# Allegro board SD3589CV100DMEB_PCB_VA.brd
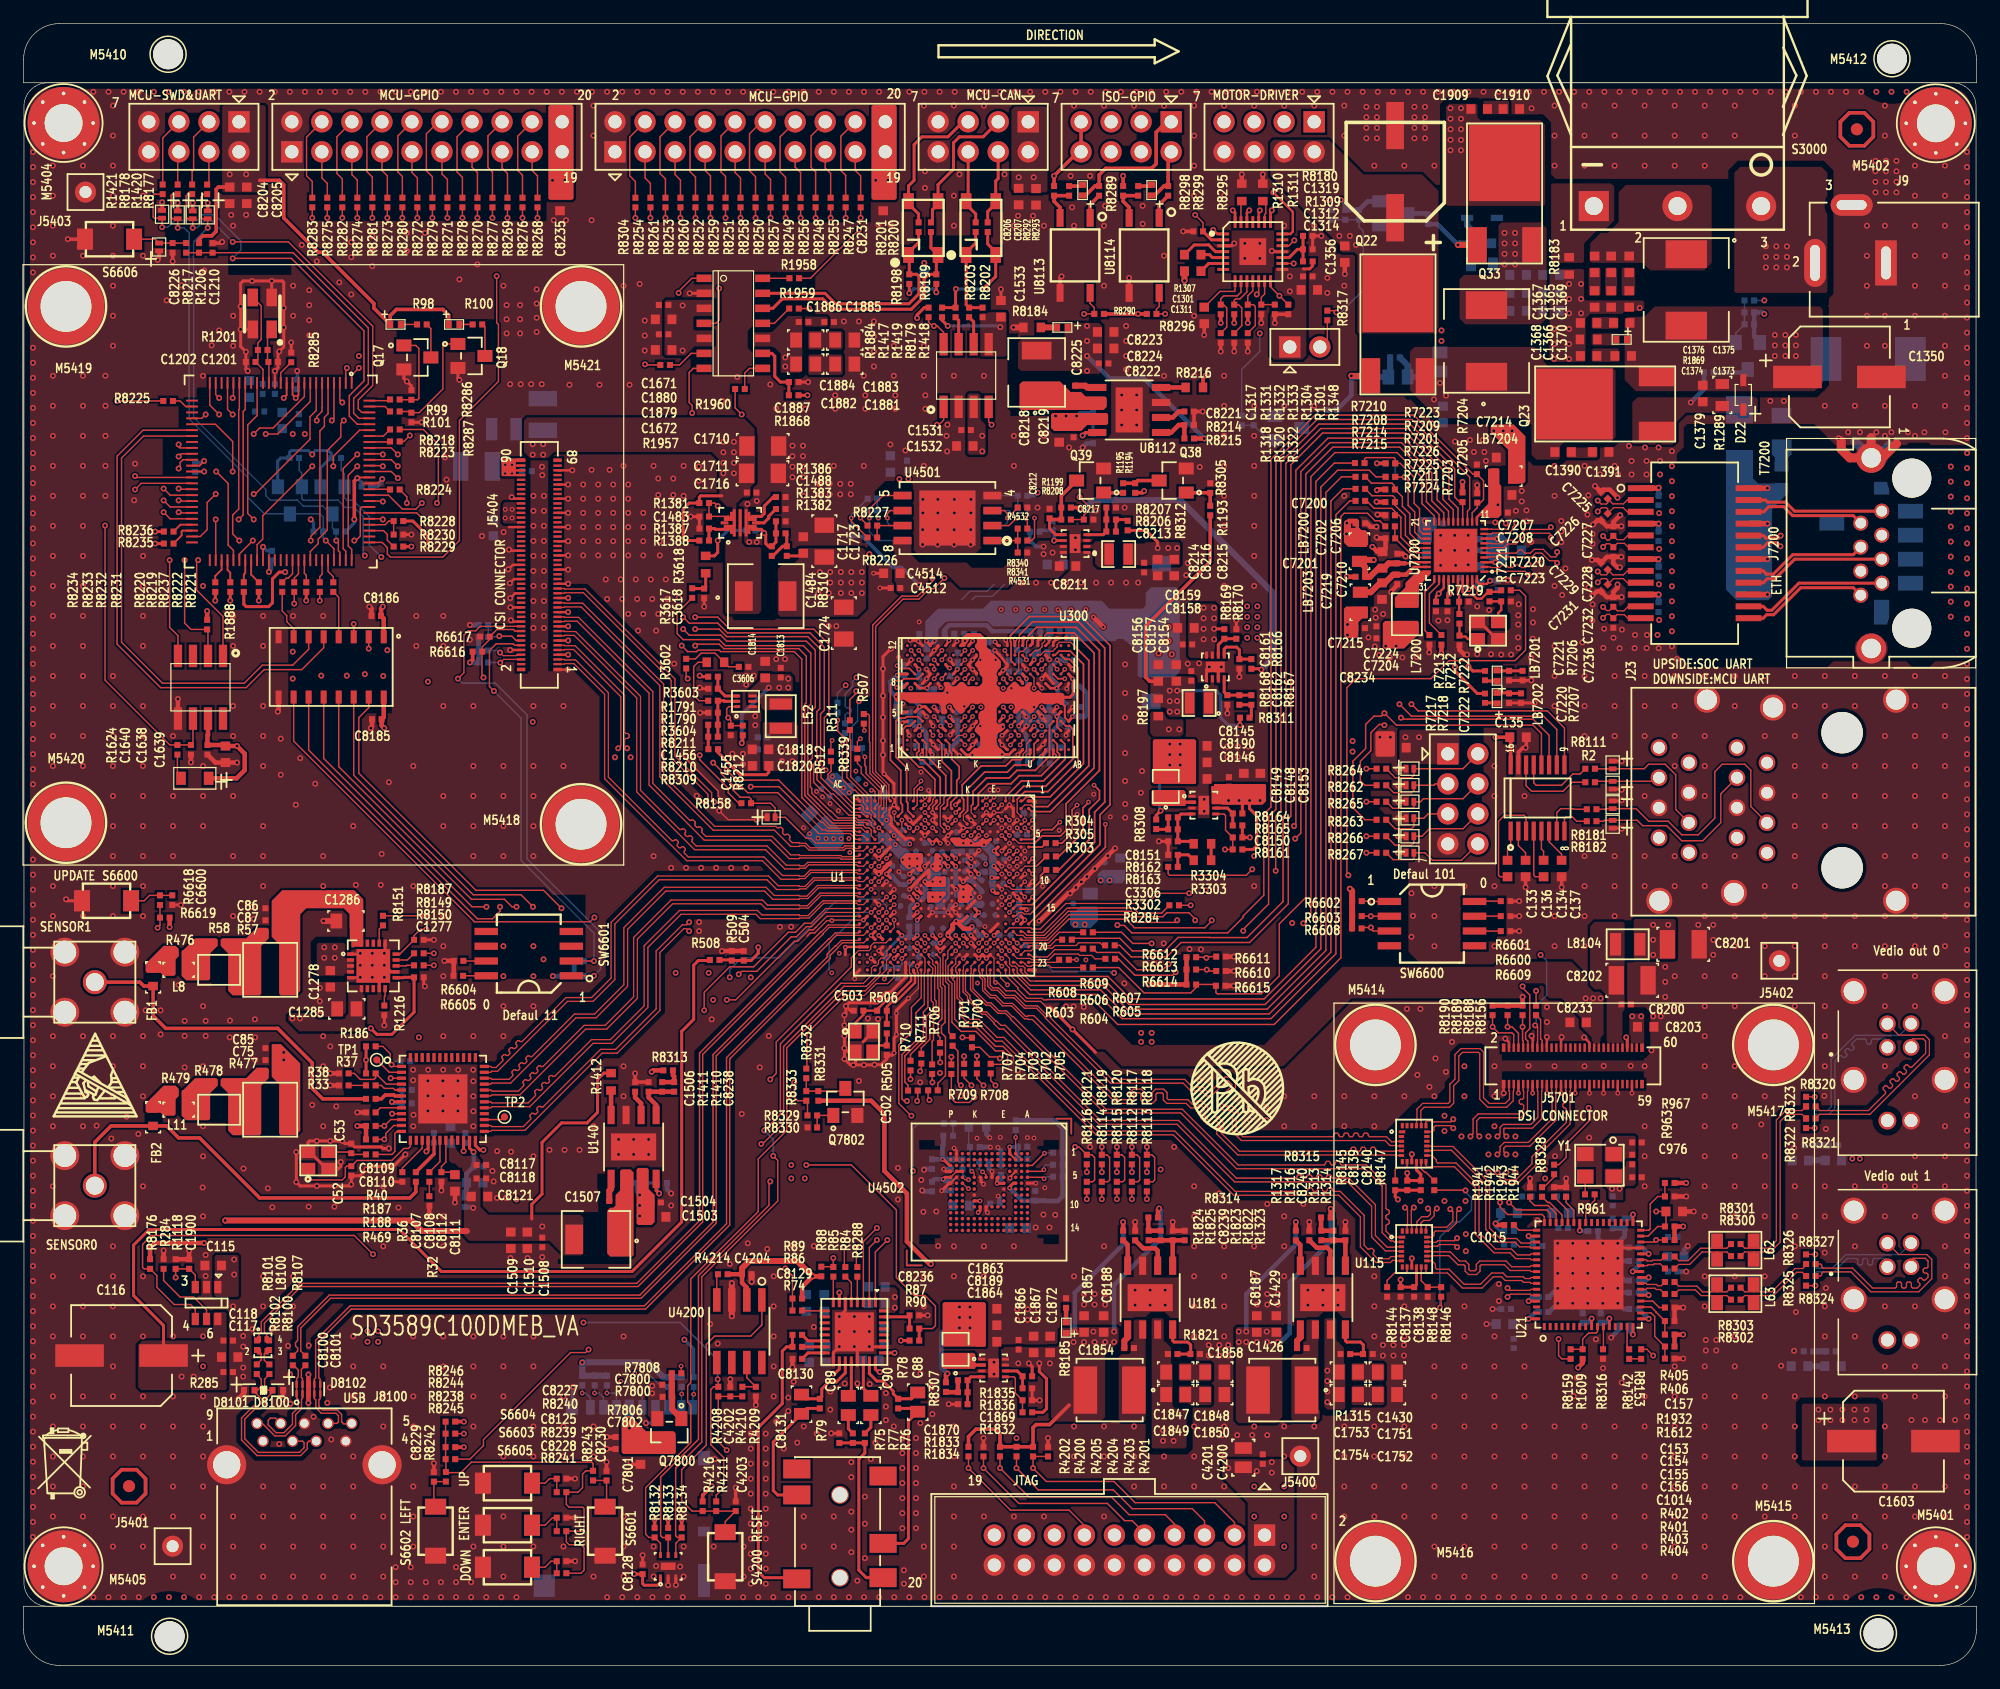
[diagram p0: board, top side]
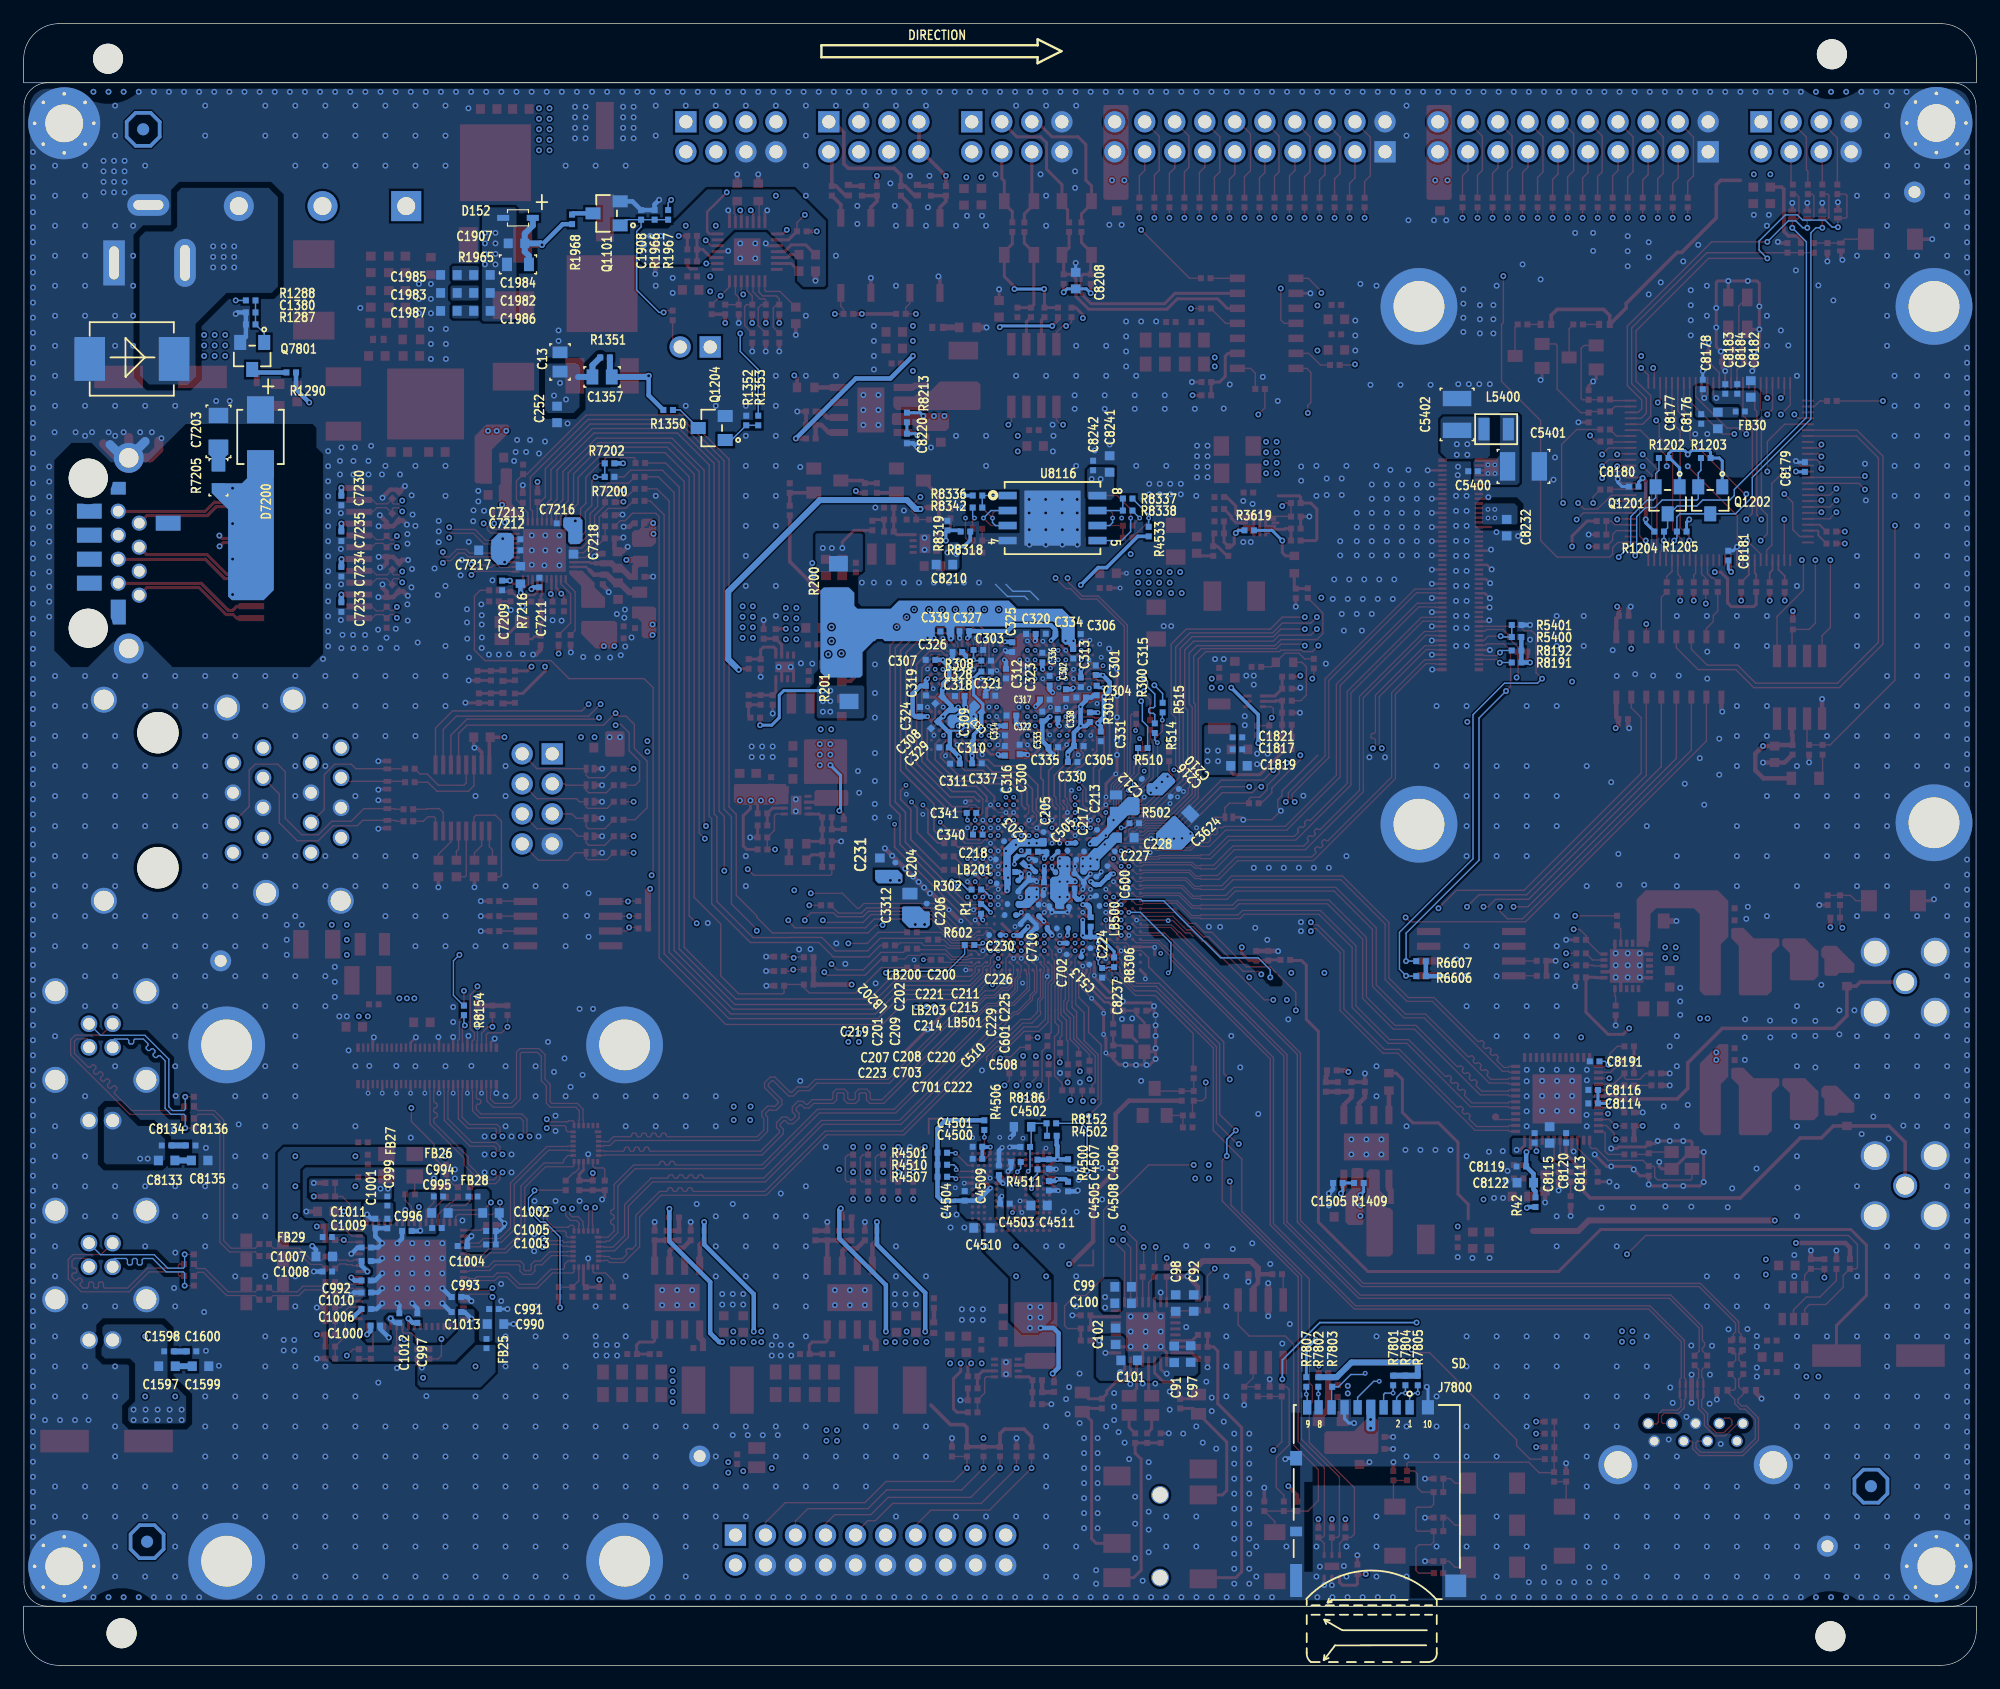
[diagram p1: board, bottom side, seen from below]

Outline 165.15 x 138.91 mm; copper layers: TOP, ART02, ART03, ART04, ART05, BOTTOM. Coordinates in mm from the lower left corner of the outline.
Outline path: 0,135.92 0,133.91 165.15,133.91 165.15,135.92 arc(164.27,138.03) 162.15,138.91 3,138.91 arc(0.88,138.03) 0,135.92 ; 0,5 0,3 arc(0.88,0.88) 3,0 162.15,0 arc(164.27,0.88) 165.15,3 165.15,5 0,5 ; 0.03,131.91 arc(0.61,133.32) 2.03,133.91 163.13,133.91 arc(164.54,133.32) 165.13,131.91 165.13,7 arc(164.54,5.59) 163.13,5 2.03,5 arc(0.61,5.59) 0.03,7 0.03,131.91

## Design rules (mm)
net group 5V0_USB_VBUS: nets 5V0_USB_VBUS USB_VBUS
net group CLK-25M: nets CLK-25M N15692228
net group DDR_CKE0_A: nets DDR_CKE0_A DDR_CKE0_A_R
net group DDR_CKE0_B: nets DDR_CKE0_B DDR_CKE0_B_R
net group DDR_CKE1_A: nets DDR_CKE1_A DDR_CKE1_A_R
net group DDR_CKE1_B: nets DDR_CKE1_B DDR_CKE1_B_R
net group DDR_DQS1_1: nets DDR_DQS1_C_B DDR_DQS1_T_B
net group DIFFPAIR1: nets DDR_DQS0_C_B DDR_DQS0_T_B
net group DIFFPAIR2: nets DDR_DQS1_C_A DDR_DQS1_T_A
net group DIFFPAIR3: nets DDR_DQS0_C_A DDR_DQS0_T_A
net group DIFFPAIR4: nets DDR_CK_C_B DDR_CK_T_B
net group DIFFPAIR5: nets DDR_CK_C_A DDR_CK_T_A
net group DIFFPAIR6: nets N15856880 N15856884
net group DIFFPAIR9: nets N15856954 N15856958
net group ETH_XTALIN: nets ETH_XTALIN N12989
net group HPLCOM: nets HPLCOM N14351866
net group HPLOUT: nets HPLOUT N14351862
net group HPRCOM: nets HPRCOM N14351890
net group HPROUT: nets HPROUT N14351870
net group I2S0-BCLK: nets I2S0-BCLK JTAG-TDI/I2S0-BCLK
net group I2S0-MCLK: nets I2S0-MCLK JTAG-TCK/I2S0-MCLK
net group I2S0-WS: nets I2S0-WS JTAG-TMS/I2S0-WS
net group INH-SBC: nets INH-SBC N14956976
net group INT-MAX20089-R: nets INT-MAX20089 INT-MAX20089-R
net group INT-TOUCH: nets INT-TOUCH N15858416
net group ISO-GPI-12V-1: nets ISO-GPI-12V-1 N15382399
net group ISO-GPI-12V-2: nets ISO-GPI-12V-2 N15383323
net group LPSPI1-PCS0: nets LPSPI1-PCS0 N15681351
net group LPSPI1-SCK: nets LPSPI1-SCK N15685206
net group LPSPI1-SIN: nets LPSPI1-SIN N15685210
net group LPSPI1-SOUT: nets LPSPI1-SOUT N15681347
net group LSADC-CH1: nets LSADC-CH1 N15338246
net group MCU-DEBUG-LED1: nets MCU-DEBUG-LED1 N15345508
net group MCU-DEBUG-LED2: nets MCU-DEBUG-LED2 N15345620
net group MCU-LPUART0-RX: nets MCU-LPUART0-RX N15345872
net group MCU-LPUART0-TX: nets MCU-LPUART0-TX N15345876
net group MCU-RESET: nets MCU-RESET N15006441
net group MDCK/BOOT_PAR_SEL2: nets MDCK/BOOT_PAR_SEL2 MDCK/BOOT_PAR_SEL2_A
net group MDIP0: nets MDIN0 MDIP0
net group MDIP1: nets MDIN1 MDIP1
net group MDIP2: nets MDIN2 MDIP2
net group MDIP3: nets MDIN3 MDIP3
net group MOTOR-12V: nets MOTOR-12V N14939017
net group MOTOR_PWR_EN: nets MOTOR_PWR_EN N14938767
net group N12953: nets N12953 N12999
net group N14225802: nets N14225802 N14225822
net group N14225834: nets N14225834 N14225838
net group N14335964: nets N14335964 N14335972
net group N14335986: nets N14335986 N14336006
net group N14392942: nets N14392942 N14392950
net group N14395092: nets N14395092 N15670298
net group N14395166: nets N14395166 N14395174
net group N14399612: nets N14399612 N15667166
net group N14405991: nets N14405991 N15668974
net group N14938925: nets N14938925 N14938929
net group N14993949: nets N14993949 N14994201
net group N14998577: nets N14998577 N14998589
net group N15005159: nets N15005159 N15005419
net group N15345592: nets N15345592 N15345596
net group N15668477: nets N04760 N15668477
net group N153454481: nets N15345500 N153454481
net group REG_OUT_1.0V: nets N12971 REG_OUT_1.0V
net group REM-INTB-UB941: nets GPIO11-0 REM-INTB-UB941
net group RESET-N-AIC31: nets N14351464 RESET-N-AIC31
net group RGMII_TXD0/BOOT_SEL1: nets RGMII_TXD0/BOOT_SEL1 RGMII_TXD0/BOOT_SEL1_A
net group RGMII_TXD1/SFC_EMMC_BOOT_MODE: nets RGMII_TXD1/SFC_EMMC_BOOT_MODE RGMII_TXD1/SFC_MMC_BOOT_MODE_A
net group RGMII_TXEN/BOOT_PAR_SEL3: nets RGMII_TXEN/BOOT_PAR_SEL3 RGMII_TXEN/BOOT_PAR_SEL3_A
net group RS232-RXD-0: nets RS232-RXD-0 RS232-RXD-0-CON
net group RS232-RXD-1: nets RS232-RXD-1 RS232-RXD-1-CON
net group RS232-TXD-0: nets RS232-TXD-0 RS232-TXD-0-CON
net group RS232-TXD-1: nets RS232-TXD-1 RS232-TXD-1-CON
net group SDIO0_CARD_POWER_EN_N: nets N23782 SDIO0_CARD_POWER_EN_N
net group SDIO0_CCLK_OUT: nets SDIO0_CCLK_OUT SDIO0_CCLK_OUT_A
net group SFC_CLK: nets N15213490 SFC_CLK
net group SFC_MISO_IO1: nets N15213524 SFC_MISO_IO1
net group SFC_MOSI_IO0: nets N15213520 SFC_MOSI_IO0
net group SFC_WP_IO2: nets N15213544 SFC_WP_IO2
net group SIOAP: nets N14335976 SIOAP
net group SIOBP: nets N14336010 SIOBP
net group SOC-GPIO9-0: nets N15338234 SOC-GPIO9-0
net group SOC-GPIO9-1: nets N15338238 SOC-GPIO9-1
net group SOC-GPIO9-4: nets N15858552 SOC-GPIO9-4
net group SOC-GPIO9-6: nets N15338242 SOC-GPIO9-6
net group SWD-CLK: nets N15345682 SWD-CLK
net group SWD-DIO: nets N15345702 SWD-DIO
net group UART0-RXD: nets N15336763 UART0-RXD
net group UART0-TXD: nets N15336783 UART0-TXD
net group USB3_RX0: nets USB3_RXM0 USB3_RXP0
net group USB3_TX+_0: nets USB3_TX+_0 USB3_TXP0
net group USB3_TX-_0: nets USB3_TX-_0 USB3_TXM0
net group XOUT-MAX9296: nets N14335514 XOUT-MAX9296
net group XTAL-IN: nets XTAL-IN XTAL-OUT
net group 3W: nets DDR_RESET_N EMMC_RST_N EPHY_RSTN JTAG-TCK MOTOR-RESET SENSOR1_RSTN
net group 5V0: nets 5V0 EN-0V6 EN-DVDD N14392854 N14392866 N14393098 N14403209 N14993859 N15001139
net group 12V: nets +B-IN
net group 12V-SW-MCU: nets 12V-SW-MCU N14938573 N14956848 N14957638 N14957702 N14957754 N14957806 N14957880 N14987970 N15005095
net group +BAT: nets +BAT N14932009 N14932045 N14932053 N14932105 N14956760 N14957140 N14957152 N14957240 N14957272 N14957420 N14957512
net group @LIB.0619_1400(VIEW):\DDR_AC\: nets DDR_CA0_A DDR_CA0_B DDR_CA1_A DDR_CA1_B DDR_CA2_A DDR_CA2_B DDR_CA3_A DDR_CA3_B DDR_CA4_A DDR_CA4_B DDR_CA5_A DDR_CA5_B DDR_CS0_A DDR_CS0_B DDR_CS1_A DDR_CS1_B DDR_ODT_CA_A DDR_ODT_CA_B
net group @LIB.0619_1400(VIEW):\DDR_DQ\: nets DDR_DMI0_A DDR_DMI0_B DDR_DMI1_A DDR_DMI1_B DDR_DQ0_A DDR_DQ0_B DDR_DQ1_A DDR_DQ1_B DDR_DQ2_A DDR_DQ2_B DDR_DQ3_A DDR_DQ3_B DDR_DQ4_A DDR_DQ4_B DDR_DQ5_A DDR_DQ5_B DDR_DQ6_A DDR_DQ6_B DDR_DQ7_A DDR_DQ7_B DDR_DQ8_A DDR_DQ8_B DDR_DQ9_A DDR_DQ9_B DDR_DQ10_A DDR_DQ10_B DDR_DQ11_A DDR_DQ11_B DDR_DQ12_A DDR_DQ12_B DDR_DQ13_A DDR_DQ13_B DDR_DQ14_A DDR_DQ14_B DDR_DQ15_A DDR_DQ15_B
net group ADC1-SE13: nets ADC1-SE13 LSADC-CH0 N15052053
net group AIC31-DIN: nets AIC31-DIN I2S0-SD-TX JTAG-TDO/I2S0-SD-TX
net group AIC31-DOUT: nets AIC31-DOUT I2S0-SD-RX JTAG-TRSTN JTAG-TRSTN/I2S0-SD-RX
net group DOUT0-C-N: nets DOUT0-C-N DOUT0-N N14359200 N15856876
net group DOUT0-C-P: nets DOUT0-C-P DOUT0-P N14359196 N15856872
net group DOUT1-C-N: nets DOUT1-C-N DOUT1-N N14359212 N15856950
net group DOUT1-C-P: nets DOUT1-C-P DOUT1-P N14359204 N15856946
net group DVDD3318_SDIO_VOUT: nets DVDD3318_SDIO_VOUT SDIO0_CCMD SDIO0_CCMD_A SDIO0_CDATA0 SDIO0_CDATA0_A SDIO0_CDATA1 SDIO0_CDATA1_A SDIO0_CDATA2 SDIO0_CDATA2_A SDIO0_CDATA3 SDIO0_CDATA3_A
net group DVDD_CPU: nets DVDD_CPU N03062 N03106 N03110 N15667488 SVB-PWM1-CPU
net group DVDD_NPU: nets DVDD_NPU N04870 N04874 N15001391 N15667888 SVB-PWM2-NPU
net group EPHY_CLK/BOOT_PAR_SEL1: nets EPHY_CLK/BOOT_PAR_SEL1 EPHY_CLK/BOOT_PAR_SEL1_A ETH_XTALOUT N12979
net group GPIO0-0/UPDATE-MODE: nets GPIO0-0/UPDATE-MODE N14389377 RESET-TOUCH
net group ISO-GND: nets ISO-GND N15382403 N15382532 N15383343 N15383379
net group LPDDR4_4X_0V6: nets LPDDR4_4X_0V6 N15669267 N15669641
net group M-CAN1-H: nets M-CAN1-H M-CAN1-H-CON M-CAN1-L M-CAN1-L-CON N14933073 N14933173 N14933401
net group MCU2PS-PWR-EN: nets MCU2PS-PWR-EN N14957982 N15731167
net group MCU-LIN: nets MCU-LIN
net group MCU-PTA10: nets MCU-PTA10
net group MCU-PTA11: nets MCU-PTA11
net group MCU-PTA12: nets MCU-PTA12
net group MCU-PTA13: nets MCU-PTA13
net group MCU-PTA14: nets MCU-PTA14
net group MCU-PTA15: nets MCU-PTA15
net group MCU-PTB9: nets MCU-PTB9
net group MCU-PTB10: nets MCU-PTB10
net group MCU-PTB11: nets MCU-PTB11
net group MCU-PTB12: nets MCU-PTB12
net group MCU-PTC0: nets MCU-PTC0
net group MCU-PTC1: nets MCU-PTC1
net group MCU-PTC14: nets MCU-PTC14
net group MCU-PTC15: nets MCU-PTC15
net group MCU-PTC16: nets MCU-PTC16
net group MCU-PTC17: nets MCU-PTC17
net group MCU-PTD0: nets MCU-PTD0
net group MCU-PTD1: nets MCU-PTD1
net group MCU-PTD8: nets MCU-PTD8
net group MCU-PTD9: nets MCU-PTD9
net group MCU-PTD10: nets MCU-PTD10
net group MCU-PTD11: nets MCU-PTD11
net group MCU-PTD12: nets MCU-PTD12
net group MCU-PTD13: nets MCU-PTD13
net group MCU-PTD14: nets MCU-PTD14
net group MCU-PTD15: nets MCU-PTD15
net group MCU-PTD16: nets MCU-PTD16
net group MCU-PTE7: nets MCU-PTE7
net group MCU-PTE10: nets MCU-PTE10
net group MCU-PTE15: nets MCU-PTE15
net group MCU-PTE16: nets MCU-PTE16
net group MIC-IN: nets MIC-IN MICBIAS N14351764
net group MIPI-DSI-SWITCH: nets MIPI-DSI-SWITCH N14368479 N14368507
net group PWM-UB941-PORT0: nets N14357900 PWM-LCD PWM-OUT0 PWM-UB941-PORT0
net group PWM-UB941-PORT1: nets GPIO10-7 N14358802 PWM-UB941-PORT1 RESET-LCD
net group RGMII_RXD2: nets PHY_AD0 RGMII_RXD0 RGMII_RXD1 RGMII_RXD3 RXDLY TXDLY
net group SBC-CAN-H: nets N14985412 SBC-CAN-H SBC-CAN-H-CON SBC-CAN-L SBC-CAN-L-CON
net group SBC-LPSPI0-SCK: nets N14932265 N15680965 SBC-LPSPI0-SCK
net group SBC-LPSPI0-SIN: nets N14932367 N15680773 SBC-LPSPI0-SIN
net group SBC-LPSPI0_PCS0: nets N14932023 N15679477 SBC-LPSPI0_PCS0
net group SBC-LPSPI0_SOUT: nets N14932309 N15680777 SBC-LPSPI0_SOUT
net group SCL-MAX20089-R: nets N14351424 SCL-MAX20089-AIC31 SCL-MAX20089-R
net group SDA-MAX20089-R: nets N14351428 SDA-MAX20089-AIC31 SDA-MAX20089-R
net group SFC_CSN0: nets N16282 N15213502 N15897469 N15898277 SFC_CSN0 SFC_CSN1
net group SFC_HOLD_IO3: nets N15038147 N15213548 N15897611 SFC_HOLD_IO3 SYS_RSTN SYS_RSTN_3V3 SYS_RSTN_OUT/WDG_RSTN WDG_RSTN
net group SPI2-SDO: nets SPI2-SDO
net group USB_DM: nets N24834 USB_DM USB_DM_CON
net group USB_DP: nets N24822 USB_DP USB_DP_CON
net group VCC-1V2: nets N14993953 N14994049 N15670075 VCC-1V2 VCC-TERM
net group VCC-POC1: nets N14334864 N14334868 N14334990 VCC-POC1
net group VCC-POC2: nets N14334428 N14334432 N14334810 VCC-POC2
net group XIN: nets N10913 XIN XOUT

## Placement (name value [footprint] x y rotation side)
C13  10UF/50V  [SC0805]  119.79 110.29 90 bottom
C52  15pF  [SC0402]  27.71 41.83 270 top
C53  15pF  [SC0402]  27.71 43.74 90 top
C75  100nF  [SC0402]  20.85 51.21 180 top
C85  10nF  [SC0402]  20.85 52.23 180 top
C86  10nF  [SC0402]  20.85 64.06 180 top
C87  100nF  [SC0402]  20.85 63.04 180 top
C88  47uF  [SC0805]  75.62 22.28 90 top
C89  47uF  [SC0805]  69.75 22 90 top
C90  47uF  [SC0805]  71.65 22 90 top
C91  100nF  [SC0603]  67.84 26.31 90 bottom
C92  10uF  [SC0603]  66.19 30.66 270 bottom
C97  10uF  [SC0603]  66.45 26.34 270 bottom
C98  100nF  [SC0603]  67.72 30.66 90 bottom
C99  10uF  [SC0603]  72.16 32.03 0 bottom
C100  100nF  [SC0603]  72.16 30.63 0 bottom
C101  100nF  [SC0603]  71.65 25.81 180 bottom
C102  10uF  [SC0603]  72.8 27.84 90 bottom
C115  10uF  [SC0603]  16.03 33.83 180 top
C116  220uF/25V  [SCAPC2-280-327]  8.28 26.21 180 top
C117  10uF  [SC0603]  17.42 26.09 0 top
C118  100nF  [SC0402]  17.3 27.48 0 top
C133  100nF  [SC0603]  125.5 67.42 90 top
C134  100nF  [SC0603]  128.55 67.42 270 top
C135  100nF  [SC0603]  126.39 78.54 0 top
C136  100nF  [SC0603]  127.03 67.42 270 top
C137  100nF  [SC0603]  130.07 67.42 270 top
C153  100nF-50V  [SC0402]  139.22 34.59 0 top
C154  100nF-50V  [SC0402]  139.22 33.58 0 top
C155  100nF-50V  [SC0402]  139.22 32.44 0 top
C156  100nF-50V  [SC0402]  139.22 31.42 0 top
C157  10uF  [SC0603]  139.6 38.4 0 top
C200  4.7uF  [SC0402-BGA]  78.16 68.83 180 bottom
C201  1uF  [SC0402-BGA]  81.03 65.93 270 bottom
C202  4.7uF  [SC0402-BGA]  79.59 67.64 90 bottom
C203  4.7uF  [SC0402-BGA]  81.89 69.39 45 bottom
C204  220nF/NC  [SC0402-BGA]  91.43 67.45 90 bottom
C205  220nF  [SC0402-BGA]  78.89 70.04 90 bottom
C206  4.7uF  [SC0402-BGA]  88.77 63.98 90.1 bottom
C207  4.7uF  [SC0402-BGA]  81.47 64.41 0 bottom
C208  220nF  [SC0402-BGA]  79.78 64.36 180 bottom
C209  100nF  [SC0402-BGA]  80.06 65.96 90 bottom
C210  4.7uF  [SC0402-BGA]  67.79 74.5 225 bottom
C211  220nF  [SC0402-BGA]  76.61 68.17 180 bottom
C212  220nF/NC*  [SC0402-BGA]  70.24 74.67 45 bottom
C213  10uF  [SC0603B]  72.76 72.95 90 bottom
C214  4.7uF  [SC0402-BGA]  78.44 65.18 0 bottom
C215  4.7uF  [SC0402-BGA]  76.73 67.01 180 bottom
C216  220nF  [SC0402-BGA]  68.49 73.84 225 bottom
C217  100nF/NC*  [SC0402-BGA]  74.37 70.22 90 bottom
C218  4.7uF  [SC0402-BGA]  82.45 68.2 0 bottom
C219  4.7uF  [SC0402-BGA]  82.37 66.15 0 bottom
C220  100nF  [SC0402-BGA]  77.93 64.24 0 bottom
C221  4.7uF  [SC0402-BGA]  78.36 67.11 180 bottom
C222  1uF  [SC0402-BGA]  77.29 62.36 0 bottom
C223  1uF  [SC0402-BGA]  81.7 63.49 0 bottom
C224  1uF  [SC0402-BGA]  74.93 61.16 270 bottom
C225  4.7uF  [SC0402-BGA]  74.43 67.21 270 bottom
C226  4.7uF  [SC0402-BGA]  74.99 68.87 0 bottom
C227  220nF  [SC0402-BGA]  73.33 68.87 180 bottom
C228  22uF  [SC0603-TD]  71.93 70.04 180 bottom
C229  220nF  [SC0402-BGA]  75.48 66.7 270 bottom
C230  1uF  [SC0402-BGA]  83.02 61.8 0 bottom
C231  10uF/NC  [SC0603-TD]  92.74 67.61 90 bottom
C252  100NF/50V  [SC0603]  120.04 105.84 270 bottom
C300  470NF  [SC0402]  80.91 77.5 90 bottom
C301  1uF  [SC0402]  75.74 83.18 270 bottom
C302  1uF  [SC0402]  77 82.18 270 bottom
C303  1NF  [SC0402]  84.41 85.92 180 bottom
C304  1uF  [SC0402]  75.72 81.9 0 bottom
C305  1uF  [SC0402]  75.91 77.78 180 bottom
C306  470NF  [SC0402]  76.16 87.26 180 bottom
C307  1uF  [SC0402]  88.45 85.08 0 bottom
C308  1uF  [SC0402]  87.76 81.67 315 bottom
C309  1uF  [SC0402]  86.69 80.43 270 bottom
C310  1uF  [SC0402]  87.31 77.67 0 bottom
C311  100NF  [SC0402]  86.39 76.3 0 bottom
C312  100NF  [SC0402]  82.07 83.92 270 bottom
C313  1uF  [SC0402]  76.38 85.61 270 bottom
C314  100NF  [SC0402]  82.16 79.09 270 bottom
C315  100NF  [SC0402]  74.47 84.21 90 bottom
C316  470NF  [SC0402]  82.17 77.39 90 bottom
C317  100NF  [SC0402]  78.79 81.72 180 bottom
C318  1uF  [SC0402]  85.98 82.02 0 bottom
C319  1uF  [SC0402]  88.84 82.48 270 bottom
C320  1uF  [SC0402]  79.96 87.27 0 bottom
C321  100NF  [SC0402]  83.38 82.05 180 bottom
C322  1uF  [SC0402]  81.61 80.37 0 bottom
C323  1uF  [SC0402]  78.38 83.32 90 bottom
C324  470NF  [SC0402]  89.33 80.69 90 bottom
C325  100NF  [SC0402]  81.55 86.16 270 bottom
C326  100NF  [SC0402]  86.18 85.75 0 bottom
C327  100NF  [SC0402]  85.59 87.51 0 bottom
C328  470NF  [SC0402]  83.74 84.09 180 bottom
C329  1uF  [SC0402]  88.12 79.57 315 bottom
C330  1uF  [SC0402]  76.43 76.43 180 bottom
C331  100NF  [SC0402]  74.05 78.6 270 bottom
C332  1uF  [SC0402]  84.43 80.92 45 bottom
C333  470NF  [SC0402]  79 80.29 90 bottom
C334  470NF  [SC0402]  78.3 87.29 0 bottom
C335  100NF  [SC0402]  78.07 77.69 180 bottom
C336  100NF  [SC0402]  78.99 85.27 90 bottom
C337  1uF  [SC0402]  84.53 76.32 180 bottom
C338  100NF  [SC0402]  77.69 80.51 90 bottom
C339  100NF  [SC0402]  87.21 87.48 0 bottom
C340  1pF  [SC0402-PA]  84.45 70.29 0 bottom
C341  1pF  [SC0402-PA]  84.99 72.14 0 bottom
C502  18PF-NPO  [SC0402]  73 52.04 270 top
C503  18PF-NPO  [SC0402]  70.61 55.4 180 top
C504  100NF/NC*  [SC0402]  60.91 60.05 90 top
C505  1uF  [SC0402-BGA]  76.53 69.27 315 bottom
C508  1uF  [SC0402-BGA]  74.64 64.26 180 bottom
C510  1uF  [SC0402-BGA]  76.39 64.51 315 bottom
C513  1uF  [SC0402-BGA]  75.36 59.63 225 bottom
C600  1uF  [SC0402-BGA]  73.48 67.16 90 bottom
C601  1uF  [SC0402-BGA]  74.46 65.6 270 bottom
C701  1uF  [SC0402-BGA]  79.04 62.4 0 bottom
C702  4.7uF  [SC0402-BGA]  76.94 60.63 270 bottom
C703  1uF  [SC0402-BGA]  79.76 63.4 0 bottom
C710  1uF  [SC0402-BGA]  80.84 62.23 90 bottom
C976  100nF  [SC0402]  136.45 41.3 0 top
C990  10uF  [SC0603]  125.25 28.88 180 bottom
C991  1uF  [SC0402]  125.37 30.15 180 bottom
C992  100nF  [SC0402]  136.17 32.56 180 bottom
C993  100nF  [SC0402]  128.55 31.17 0 bottom
C994  10uF  [SC0603]  129.95 38.28 180 bottom
C995  1uF  [SC0402]  130.2 37.01 180 bottom
C996  100nF  [SC0402]  132.74 36.75 0 bottom
C997  100nF  [SC0402]  131.85 29.39 90 bottom
C999  1uF  [SC0402]  134.39 37.39 270 bottom
C1000  100nF  [SC0402]  135.41 28.75 180 bottom
C1001  100nF  [SC0402]  135.41 37.39 270 bottom
C1002  10uF  [SC0603]  125.63 38.28 180 bottom
C1003  1uF  [SC0402]  125.63 35.61 180 bottom
C1004  100nF  [SC0402]  128.04 35.48 0 bottom
C1005  100nF  [SC0402]  125.63 36.75 180 bottom
C1006  100nF  [SC0402]  136.17 30.15 180 bottom
C1007  10uF  [SC0603]  139.73 34.59 0 bottom
C1008  1uF  [SC0402]  139.47 33.32 0 bottom
C1009  100nF  [SC0402]  136.17 34.21 180 bottom
C1010  100nF  [SC0402]  136.17 31.55 180 bottom
C1011  100nF  [SC0402]  136.17 35.36 180 bottom
C1012  100nF  [SC0402]  133.38 29.39 90 bottom
C1013  100nF  [SC0402]  128.55 29.9 0 bottom
C1014  10nF  [SC0402]  139.22 30.28 0 top
C1015  10nF  [SC0402]  125.63 37.26 180 top
C1201  15pf  [SC0402]  21.11 110.29 0 top
C1202  15pf  [SC0402]  19.2 110.29 180 top
C1210  100nF  [SC0402]  15.98 119.94 90 top
C1277  100nF  [SC0402]  33.43 58.22 0 top
C1278  10uF  [SC0603]  25.93 58.09 270 top
C1285  22uF/50V  [SC0805]  27.33 55.55 180 top
C1286  22uF/50V  [SC0805]  27.26 62.98 180 top
C1301  100nF/50V  [SC0603]  98.88 119.37 0 top
C1311  100nF/50V  [SC0603]  98.88 117.97 0 top
C1312  100nF  [SC0402]  108.61 117.53 0 top
C1314  10uF/10V  [SC0603]  108.74 116.38 0 top
C1317  220nf/25V  [SC0603]  99.85 114.22 270 top
C1319  100nF  [SC0402]  108.61 119.81 0 top
C1350  220uF/25V  [SCAPC2-280-327]  153.57 109.02 0 top
C1356  100nF/50  [SC0603]  111.73 119.41 270 top
C1357  4.7uF/50V  [SC0805]  116.23 109.02 180 bottom
C1362  220uF  [SMD0607]  115.99 126.39 180 top
C1365  10nF/100V  [SC0603]  134.26 118.54 270 top
C1366  10nF/100V  [SC0603]  134.26 115.62 270 top
C1367  100nF/50V  [SC0603]  132.87 118.54 270 top
C1368  100nF/50V  [SC0603]  132.87 115.62 270 top
C1369  1uF/50V  [SC0603]  135.79 118.54 270 top
C1370  1uF/50V  [SC0603]  135.79 115.62 270 top
C1373  100nF/50V  [SC0603]  135.28 110.79 180 top
C1374  100nF/50V  [SC0603]  132.36 110.79 180 top
C1375  10nF/100V  [SC0603]  135.15 113.59 180 top
C1376  10nF/100V  [SC0603]  132.36 113.59 180 top
C1379  4.7nF/50V  [SC0603]  142.01 107.62 270 top
C1380  10nF/50V  [SC0402]  145.95 114.48 0 bottom
C1390  100nF/50V  [SC0603]  130.2 102.67 0 top
C1391  100nF/50V  [SC0603]  133.38 102.67 0 top
C1426  100nF/50V  [SC0402]  108.1 26.85 180 top
C1429  22uF/16V  [SC0603]  105.94 28.88 90 top
C1430  1nF/50V  [SC0402]  113.69 26.34 0 top
C1455  1nF/50V  [SC0402]  59.8 79.11 270 top
C1456  10pF/50V  [SC0402]  58.31 79.59 0 top
C1483  1nF/50V  [SC0402]  57.56 97.21 180 top
C1484  10pF/50V  [SC0402]  63.27 94.28 270 top
C1488  15nF/50V  [SC0402]  64.03 97.84 0 top
C1503  22uF/50V  [SC0603]  53.62 37.95 0 top
C1504  100nF/50V  [SC0402]  53.49 39.17 0 top
C1505  10nF/50V  [SC0402]  54 40.82 0 bottom
C1506  2.2uF/50V  [SC0402]  51.71 48.95 90 top
C1507  2.2uF/50V  [SC0402]  49.94 39.29 180 top
C1508  100nF/50V  [SC0402]  43.87 35.79 270 top
C1509  1uF/16V  [SC0603]  41.2 35.97 270 top
C1510  22uF/16V  [SC0603]  42.6 35.97 270 top
C1531  100nF  [SC0402]  79.71 104.52 0 top
C1532  1uF  [SC0603]  79.6 103.17 0 top
C1533  4.7nF  [SC0603]  82.65 114.78 270 top
C1597  22uF/50V  [SC0603]  153.03 25.31 0 bottom
C1598  100nF/50V  [SC0402]  152.86 26.57 0 bottom
C1599  22uF/50V  [SC0603]  150.19 25.31 0 bottom
C1600  100nF/50V  [SC0402]  150.95 26.57 0 bottom
C1603  220uF  [SCAPC2-280-327]  158.14 18.97 0 top
C1638  100nF  [SC0402]  15.54 77.47 90 top
C1639  2.2uF  [SC0603]  17.07 77.09 270 top
C1640  1nF  [SC0402]  14.15 77.47 270 top
C1671  100nF/50V  [SC0402]  54.13 115.11 180 top
C1672  1uF/16V  [SC0603]  54.13 111.3 180 top
C1710  22uF/10V  [SC1206]  62.51 103.17 0 top
C1711  22uF/10V  [SC1206]  62.48 100.86 0 top
C1716  470nF/10V  [SC0402]  61.57 99.24 0 top
C1717  2.2uF/20V  [SC0603]  65.94 94.79 90 top
C1723  22uF/10V  [SC1206]  67.72 95.12 90 top
C1724  22uF/10V  [SC1206]  69.37 88.19 270 top
C1751  22uF/50V  [SC0805]  115.34 24.82 180 top
C1752  4.7uF/50V  [SC0805]  115.34 22.91 180 top
C1753  22uF/50V  [SC0805]  112.04 24.82 180 top
C1754  4.7uF/50V  [SC0805]  112.04 22.91 180 top
C1813  100nF/50V  [SC0402]  64.03 84 90 top
C1814  22uF/50V  [SC0603]  62.71 84.25 90 top
C1817  100nF/50V  [SC0402]  62.5 77.51 180 bottom
C1818  1uF/16V  [SC0603]  62.32 77.51 180 top
C1819  22uF/16V  [SC0603]  62.37 76.11 180 bottom
C1820  1uF/16V  [SC0603]  62.32 76.11 180 top
C1821  100nF/50V  [SC0402]  62.5 78.52 180 bottom
C1847  22uF/50V  [SC0805]  97.43 24.82 180 top
C1848  22uF/50V  [SC0805]  100.74 24.82 180 top
C1849  4.7uF/50V  [SC0805]  97.43 22.91 180 top
C1850  4.7uF/50V  [SC0805]  100.74 22.91 180 top
C1854  100nF/50V  [SC0402]  93.5 26.85 180 top
C1857  22uF/16V  [SC0603]  89.69 28.88 90 top
C1858  1nF/50V  [SC0402]  99.09 26.34 0 top
C1863  1uF/16V  [SC0603]  81.61 30.18 0 top
C1864  22uF/16V  [SC0603]  81.61 27.38 0 top
C1866  100nF/50V  [SC0402]  84.15 27.13 90 top
C1867  22uF/50V  [SC0603]  85.42 27.15 90 top
C1869  10nF/50V  [SC0402]  84.89 22.43 0 top
C1870  10pF/50V  [SC0402]  79.43 24.13 0 top
C1872  4.7uF/50V  [SC0603]  86.82 27.15 90 top
C1879  100nF/50V  [SC0402]  54.13 112.62 180 top
C1880  1uF/16V  [SC0603]  54.13 113.89 180 top
C1881  22uF/50V  [SC0805]  69.44 110.11 0 top
C1882  22uF/50V  [SC0805]  66.14 110.11 0 top
C1883  4.7uF/50V  [SC0805]  69.44 112.14 0 top
C1884  4.7uF/50V  [SC0805]  66.14 112.14 0 top
C1885  100nF/50V  [SC0402]  68.12 113.66 180 top
C1886  100nF/50V  [SC0402]  65.96 113.66 180 top
C1887  10nF/50V  [SC0402]  65.13 108.58 0 top
C1900  1nF/50V  [SC0402]  14 33.96 90 top
C1907  4.7nF/50V  [SC0603]  123.47 120.32 180 bottom
C1908  10nF/50V  [SC0402]  112.93 122.73 90 bottom
C1909  100nF/50V  [SC0603]  123.1 131.69 0 top
C1910  100nF/50V  [SC0603]  125.82 131.69 0 top
C1982  10nF/100V  [SC0603]  126.39 116.13 0 bottom
C1983  10nF/100V  [SC0603]  129.18 116.13 0 bottom
C1984  1uF/50V  [SC0603]  126.39 117.65 0 bottom
C1985  1uF/50V  [SC0603]  129.18 117.65 0 bottom
C1986  10nF/100V  [SC0603]  126.39 114.6 0 bottom
C1987  10nF/100V  [SC0603]  129.18 114.6 0 bottom
C3306  1uF  [SC0402]  97.21 68.58 180 top
C3312  10uF/NC*  [SC0805-TD]  90.2 64.49 90 bottom
C3606  1uF  [SC0402]  60.89 84.49 0 top
C3618  1uF  [SC0402]  57.56 90.7 270 top
C3624  10uF/NC*  [SC0805-TD]  67.05 71.47 135 bottom
C4200  100NF  [SC0402]  104.8 17.45 90 top
C4201  10uF  [SC0805D]  103.15 17.58 90 top
C4202  1NF  [SC0402]  59.77 23.16 90 top
C4203  100NF/NC*  [SC0402]  60.22 13.46 90 top
C4204  100NF  [SC0402]  61.16 33.1 0 top
C4500  100NF  [SC0402]  84.48 42.87 0 bottom
C4501  2.2UF  [SC0402]  84.48 43.88 0 bottom
C4502  1NF  [SC0402]  80.44 43.87 180 bottom
C4503  100NF  [SC0402]  82.16 39.07 0 bottom
C4504  100NF  [SC0402]  85.56 39.73 90 bottom
C4505  100NF  [SC0402]  78.44 40.58 270 bottom
C4506  100NF  [SC0402]  76.82 42.42 270 bottom
C4507  100NF  [SC0402]  78.44 42.41 270 bottom
C4508  100NF  [SC0402]  76.82 40.52 270 bottom
C4509  100NF  [SC0402]  82.67 41.89 90 bottom
C4510  10UF  [SC0603]  84.1 37.01 0 bottom
C4511  10UF  [SC0603]  79.27 38.91 180 bottom
C4512  100NF  [SC0402]  73.74 91.16 180 top
C4514  10uF  [SC0603-TC]  73.43 92.41 180 top
C5400  100NF  [SC0402]  42.57 101.04 0 bottom
C5401  100UF/NC*  [SC1210]  38.3 101.45 180 bottom
C5402  100UF  [SC1210]  43.92 105.84 90 bottom
C6600  100NF  [SC0402]  12.57 64.74 270 top
C7200  4.7UF  [SC0402]  113.05 96.63 0 top
C7201  4.7UF  [SC0402]  113.05 92.11 180 top
C7202  10UF  [SC0603]  114.93 93.54 90 top
C7203  1NF-2KV  [SC1206]  148.68 104.41 90 bottom
C7204  100NF  [SC0402]  114.81 86.9 180 top
C7205  1NF  [SC0402]  122.94 98.79 90 top
C7206  100NF  [SC0402]  116.18 93.66 90 top
C7207  10UF  [SC0603]  125.17 99.03 0 top
C7208  100NF  [SC0402]  125.12 97.54 0 top
C7209  100NF  [SC0402]  124.68 91.38 270 bottom
C7210  100NF  [SC0402]  116.18 91.88 270 top
C7211  100NF  [SC0402]  121.53 91.63 90 bottom
C7212  100NF  [SC0402]  123.54 94.35 180 bottom
C7213  100NF  [SC0402]  123.55 95.28 180 bottom
C7214  10UF  [SC0603]  125.25 102.2 180 top
C7215  100NF  [SC0402]  113.04 87.77 0 top
C7216  100NF  [SC0402]  119.66 96.63 0 bottom
C7217  10UF  [SC0603]  125.97 94.35 0 bottom
C7218  10UF  [SC0603]  118.65 94.72 270 bottom
C7219  10UF  [SC0603]  114.88 90.89 270 top
C7220  1NF/NC*  [SC0402]  125.63 81.84 270 top
C7221  1NF/NC*  [SC0402]  125.63 83.74 270 top
C7222  18PF-NPO  [SC0402]  121.43 86.73 90 top
C7223  18PF-NPO  [SC0402]  125.37 90.03 180 top
C7224  4.7uF  [SC0402-PC]  114.81 87.92 180 top
C7225  6PF/NC*  [SC0402]  133.69 99 135 top
C7226  6PF/NC*  [SC0402]  133.69 97.17 225 top
C7227  6PF/NC*  [SC0402]  134.45 95.98 90 top
C7228  6PF/NC*  [SC0402]  134.45 94.2 270 top
C7229  6PF/NC*  [SC0402]  133.69 93 135 top
C7230  39PF  [SC0402]  138.28 98.56 270 bottom
C7231  6PF/NC*  [SC0402]  133.69 91.17 225 top
C7232  6PF/NC*  [SC0402]  134.45 89.98 90 top
C7233  39PF  [SC0402]  138.28 89.54 270 bottom
C7234  39PF  [SC0402]  138.28 92.54 270 bottom
C7235  39PF  [SC0402]  138.28 95.54 270 bottom
C7236  6PF/NC*  [SC0402]  134.45 88.2 270 top
C7800  4.7UF  [SC0402]  54.42 23.73 0 top
C7801  1UF  [SC0603]  52.17 17.7 270 top
C7802  100NF  [SC0402]  50.47 18.31 180 top
C8100  100NF  [SC0402]  22.76 25.79 270 top
C8101  100NF  [SC0402]  23.83 25.79 270 top
C8107  100NF  [SC0402]  33.17 41.33 270 top
C8108  100NF  [SC0402]  34.32 41.33 270 top
C8109  100NF  [SC0402]  29.36 49.07 180 top
C8110  100NF  [SC0402]  29.36 47.93 180 top
C8111  10UF  [SC0603]  36.47 40.82 270 top
C8112  100NF  [SC0402]  35.33 41.33 90 top
C8113  10nF  [SC0402]  34.7 44.63 90 bottom
C8114  100nF  [SC0402]  32.41 47.55 0 bottom
C8115  10nF  [SC0402]  37.36 44.63 90 bottom
C8116  100nF  [SC0402]  32.41 48.69 0 bottom
C8117  10nF  [SC0402]  38.71 42.34 0 top
C8118  100nF  [SC0402]  38.71 41.2 0 top
C8119  10nF  [SC0402]  38.48 42.21 0 bottom
C8120  10UF  [SC0603]  36.09 44.88 90 bottom
C8121  10UF  [SC0603]  38.56 39.67 0 top
C8122  10UF  [SC0603]  38.15 40.84 0 bottom
C8125  100NF  [SC0402]  45.49 12.5 0 top
C8128  100NF  [SC0402]  52.35 8.13 270 top
C8129  100nF  [SC0402]  65.43 27.97 0 top
C8130  100nF  [SC0402]  65.43 25.93 0 top
C8131  47uF  [SC0805]  65.79 22.1 90 top
C8133  22uF/50V  [SC0603]  153.06 42.72 0 bottom
C8134  100nF/50V  [SC0402]  153.06 43.99 0 bottom
C8135  22uF/50V  [SC0603]  150.27 42.72 0 bottom
C8136  100nF/50V  [SC0402]  151.03 43.99 0 bottom
C8137  100NF  [SC0402]  116.46 31.6 270 top
C8138  4.7uF  [SC0402-PC]  117.6 31.6 270 top
C8139  100NF  [SC0402]  117.02 40.61 270 top
C8140  4.7uF  [SC0402-PC]  118.16 40.61 270 top
C8145  22uF/16V  [SC0603]  99.39 77.8 0 top
C8146  1uF/16V  [SC0603]  99.39 75.01 0 top
C8148  22uF/50V  [SC0603]  103.2 74.78 90 top
C8149  100nF/50V  [SC0402]  101.93 74.75 90 top
C8150  1nF/50V  [SC0402]  102.67 70.05 0 top
C8151  10pF/50V  [SC0402]  97.21 71.75 0 top
C8153  4.7uF/50V  [SC0603]  104.6 74.78 90 top
C8154  100nF/50V  [SC0402]  98.76 83.72 90 top
C8156  22uF/16V  [SC0603]  95.96 83.97 90 top
C8157  1uF/16V  [SC0603]  97.49 83.97 90 top
C8158  100nF/50V  [SC0402]  98.43 86.39 180 top
C8159  22uF/50V  [SC0603]  98.3 87.78 180 top
C8161  10nF/50V  [SC0402]  102.82 84.73 270 top
C8162  10pF/50V  [SC0402]  102.82 81.69 90 top
C8176  10uF  [SC0603]  21.87 105.33 270 bottom
C8177  1uF  [SC0402]  23.27 105.46 270 bottom
C8178  100nF  [SC0402]  23.14 108.38 90 bottom
C8179  100nF  [SC0402]  14.5 101.4 90 bottom
C8180  100nF  [SC0402]  28.98 99.75 0 bottom
C8181  100nF  [SC0402]  20.98 93.9 90 bottom
C8182  10uF  [SC0603]  19.08 108 90 bottom
C8183  100nF  [SC0402]  21.23 108 90 bottom
C8184  1nF  [SC0402]  20.22 108 90 bottom
C8185  100nF/50V  [SC0402]  29.87 80.06 0 top
C8186  100nF/50V  [SC0402]  29.82 88.8 180 top
C8187  22uF/16V  [SC0603]  104.29 28.88 90 top
C8188  22uF/16V  [SC0603]  91.34 28.88 90 top
C8189  22uF/16V  [SC0603]  81.61 28.78 0 top
C8190  22uF/16V  [SC0603]  99.39 76.4 0 top
C8191  1NF  [SC0402]  32.28 51.1 180 bottom
C8200  100NF  [SC0402]  135.53 55.93 0 top
C8201  100UF  [SC1210]  140.36 61.01 0 top
C8202  100UF/NC*  [SC1210]  136.04 57.96 0 top
C8203  22uF/50V  [SC0603]  137.19 54.03 0 top
C8204  10uF  [SC0603]  17.42 124.38 90 top
C8205  10uF  [SC0603]  18.87 124.38 270 top
C8206  10uF  [SC0603]  84.15 124.28 90 top
C8207  10uF  [SC0603]  85.62 124.26 270 top
C8208  4.7nF  [SC0603]  76.17 117.17 270 bottom
C8210  22uF/50V  [SC0603]  87.27 93.14 0 bottom
C8211  4.7uF/50V  [SC0603]  88.29 93.01 0 top
C8212  10nF/50V  [SC0402]  86.77 97.46 90 top
C8213  1nF/NC  [SC0402]  91.97 95.94 180 top
C8214  100nF/50V  [SC0402]  94.77 92.89 270 top
C8215  22uF/16V  [SC0603]  97.31 92.89 270 top
C8216  1uF/16V  [SC0603]  95.91 92.89 270 top
C8217  100nF/50V  [SC0402]  90.07 96.95 0 top
C8218  22uF/50V  [SC0603]  87.58 104.19 270 top
C8219  100nF/50V  [SC0402]  88.8 104.32 270 top
C8220  10nF/50V  [SC0402]  90.45 103.81 270 bottom
C8221  2.2uF/50V  [SC0402]  98.58 106.1 0 top
C8222  100nF/50V  [SC0402]  91.34 110.16 0 top
C8223  1uF/16V  [SC0603]  91.52 112.83 0 top
C8224  22uF/16V  [SC0603]  91.52 111.43 0 top
C8225  2.2uF/50V  [SC0402]  88.93 107.87 90 top
C8226  100NF  [SC0402]  12.6 119.94 270 top
C8227  100NF  [SC0402]  45.49 15.8 0 top
C8228  100NF  [SC0402]  45.49 8.81 0 top
C8229  100NF  [SC0402]  34.7 15.95 90 top
C8230  100NF  [SC0402]  49.3 16.05 90 top
C8231  10uF/10V  [SC0603]  72.69 123.77 270 top
C8232  22uF/50V  [SC0603]  39.73 96.27 270 bottom
C8233  22UF  [SC0603]  131.47 54.41 180 top
C8234  10uF  [SC0603]  116.23 77.65 0 top
C8235  10uF/10V  [SC0603]  45.36 123.77 270 top
C8236  1NF  [SC0402]  75.34 29.62 0 top
C8237  2.2UF  [SC0402]  73.94 58.6 270 bottom
C8238  NC  [SC0402]  55.02 48.95 90 top
C8239  NC  [SC0402]  95.15 36.37 90 top
C8240  NC  [SC0402]  109.75 36.37 90 top
C8241  10uF  [SC0603-TC]  73.3 101.65 90 bottom
C8242  100NF  [SC0402]  74.7 101.52 90 bottom
D1  LED-0402 GREEN  [LED0402]  31.9 113.46 180 top
D2  LED-0402 GREEN  [LED0402]  36.86 113.46 180 top
D19  5.0SMDJ24CA  [DO-214AB]  159.56 110.54 180 bottom
D22  DIODE 550mV@500mA  [SOD323-N]  145.44 107.49 270 top
D27  PESDMC2FD18VB/NC  [DFN1006]  134.39 74.8 270 top
D28  PESDMC2FD18VB/NC  [DFN1006]  134.39 75.86 90 top
D132  RRE02VTM4SFHTR  [DIODE_80_56_24]  14.48 75.06 180 top
D138  LED-0402 GREEN  [LED0402]  134.7 112.19 0 top
D152  DIODE 550mV@500mA  [SOD323-N]  123.34 122.48 180 bottom
D1116  NC  [DFN1006]  14.3 123.06 270 top
D1117  NC  [DFN1006]  11.71 123.11 270 top
D7200  DZ3  [SD1714D]  145.12 103.95 270 bottom
D7201  LED-0402 GREEN  [LED0402]  124.61 84.19 270 top
D7202  LED-0402 GREEN  [LED0402]  124.61 82.29 270 top
D8100  DZ5-2  [SD0402K]  21.49 23.28 180 top
D8101  DZ5-2  [SD0402K]  19.08 23.28 0 top
D8102  DT1240A-04LP  [MLF10D-050-0301L]  24.08 23.38 0 top
D8103  NC  [DFN1006]  13.03 123.06 270 top
D8104  NC  [DFN1006]  15.57 123.06 270 top
D8105  PESDMC2FD18VB/NC  [DFN1006]  134.39 72.49 90 top
D8106  PESDMC2FD18VB/NC  [DFN1006]  134.39 71.5 270 top
D8107  LED-0402 GREEN  [LED0402]  87.4 113.21 0 top
D8108  LED-0402 GREEN  [LED0402]  88.18 29.02 270 top
D8109  NC  [DFN1006]  116.92 74.47 0 top
D8110  NC  [DFN1006]  116.92 71.68 0 top
D8111  NC  [DFN1006]  116.92 75.87 0 top
D8112  NC  [DFN1006]  116.92 73.08 0 top
D8113  NC  [DFN1006]  116.92 70.15 0 top
D8114  NC  [DFN1006]  116.92 68.76 0 top
D8115  LED-0402 GREEN  [LED0402]  89.56 125.27 270 top
D8116  LED-0402 GREEN  [LED0402]  95.4 125.27 270 top
D8117  PESDMC2FD18VB  [DFN1006]  11.46 119.68 90 top
D8118  NC  [DFN1006]  62.89 71.75 0 top
FB1  1500ohm_1GHz 500mA  [SL0603]  10.95 58.22 270 top
FB2  1500ohm_1GHz 500mA  [SL0603]  10.95 46.38 270 top
FB25  600R_100MHz 300mA  [SL0402]  126.01 27.23 90 bottom
FB26  600R_100MHz 300mA  [SL0402]  130.07 39.67 0 bottom
FB27  600R_100MHz 300mA  [SL0402]  134.39 39.29 270 bottom
FB28  600R_100MHz 300mA  [SL0402]  127.15 39.67 0 bottom
FB29  600R_100MHz 300mA  [SL0402]  139.47 36.25 0 bottom
FB30  600R_100MHz 300mA  [SL0402]  19.96 106.1 180 bottom
J6  2x10P_2_54mm_jtag  [HDR_2X10_100_S_T]  93.52 9.75 180 top
J9  DC-005 2.0  [PWC0103-M-N]  157.51 118.67 0 top
J10  FAKRA_Z  [VAF5-FAKRA]  6.02 40.59 0 top
J11  FAKRA_Z  [VAF5-FAKRA]  6.02 57.81 0 top
J21  PJ-342  [CON_3P5MM_PJ342]  69.04 10.82 270 top
J23  CON_DUAL-RJ45  [CON-DUAL-RJ45]  153.8 73.2 270 top
J29  2x10P 2.54mm  [HDR_2X10_100_S_T_DIP]  57.63 130.61 0 top
J57  A-M22049-6-B  [HSD-99S20D-40MA5-Z]  164.57 33.32 270 top
J5400  *  [HEAD0101-T-B]  107.98 17.7 0 top
J5401  *  [HEAD0101-T-B]  12.6 10.08 0 top
J5402  *  [HEAD0101-T-B]  148.49 59.61 0 top
J5403  *  [HEAD0101-T-B]  5.23 124.66 0 top
J5404  DF40HC(3.0)-90DS-0.4V  [SED90-16F]  43.61 93.12 90 top
J5701  DF40HC(3.0)-60DS-0.4V  [SED60-16F-A]  131.02 50.72 0 top
J7200  MJ8-S-M2  [MJ8-SR-BZ-A]  157.15 97.66 90 top
J7800  SIMM10S4_B  [HSDC10-1614B]  50.71 13.86 180 bottom
J8100  U231-091N-4BLRC19-F1  [USB9-200-1516]  20.24 18.97 0 top
J8103  A-M22049-6-B  [HSD-99S20D-40MA5-Z]  164.57 51.89 270 top
J8104  2x4P 2.54mm  [HDR_2X4_100_S_T]  18.21 130.61 0 top
J8105  2x4P 2.54mm  [HDR_2X4_100_S_T]  84.96 130.61 0 top
J8106  2x4P 2.54mm  [HDR_2X4_100_S_T]  109.14 130.61 0 top
J8107  2x4P 2.54mm  [HDR_2X4_100_S_T]  120.45 77.13 90 top
J8108  2x10P 2.54mm  [HDR_2X10_100_S_T_DIP]  30.3 130.61 0 top
J8109  2x4P 2.54mm  [HDR_2X4_100_S_T]  97.05 130.61 0 top
J8110  CON1x2 2..54mm  [HDR_1X2_100_S_T]  107.09 111.56 180 top
L6  47uH_20%  [SPL4018]  20.85 58.85 180 top
L7  10uH_20%  [SPL2520]  16.54 58.85 180 top
L8  1uH 20% 900mA  [SL0603]  13.11 58.85 180 top
L9  47uH_20%  [SPL4018]  20.85 47.02 180 top
L10  10uH_20%  [SPL2520]  16.54 47.02 180 top
L11  1uH 20% 900mA  [SL0603]  13.11 47.02 180 top
L44  2.2uH/12A  [SPL6030]  140.61 116.38 270 top
L48  1.0uH 20% 2.2A 60mR  [SPL2016]  78.82 26.75 90 top
L49  2.2uH 30% 4.7A 22mR  [SPL5045]  106.45 23.29 180 top
L52  1.0uH 20% 3.5A 42mR  [HSL1008]  64.03 80.31 270 top
L56  10uH 20% 2A 280mR  [SPL0420]  48.41 36.04 180 top
L62  DLW21SZ900HQ2B/NC  [CMCC3225]  144.77 35.14 0 top
L63  DLW21SZ900HQ2B/NC  [CMCC3225]  144.77 31.45 0 top
L78  1.0uH 20% 2.2A 60mR  [SPL2016]  99.42 81.43 180 top
L83  2.2uH/12A  [SPL6030]  123.72 112.06 90 top
L1201  ACT45B-510-2P-TL/NC  [CMCC3459]  76.09 121.62 90 top
L5400  2.2UH  [HSL1008]  40.61 104.6 0 bottom
L7200  2.2UH  [HSL1008]  116.99 88.93 270 top
L8100  *  [SL4-1210-AAA]  20.23 27.08 270 top
L8104  2.2UH  [HSL1008]  135.66 61.01 0 top
L8105  ACT45B-510-2P-TL/NC  [CMCC3459]  80.96 121.62 90 top
L8107  2.2uH 30% 4.7A 22mR  [SPL5045]  91.85 23.29 180 top
L8108  1.0uH 20% 2.2A 60mR  [SPL2016]  96.6 74.37 90 top
L8109  220nH 20%  11A11mR  [SPL4012]  62.76 90.47 0 top
L8110  10uH 20% 2A 280mR  [SPL0420]  85.67 109.4 90 top
L8111  1.0uH 20% 2.2A 60mR  [SPL2016]  92.61 94.03 0 top
LB200  LB  [SL0402]  79.77 68.85 0 bottom
LB201  LB  [SL0402]  81.69 67.13 0 bottom
LB202  LB  [SL0402]  80.87 68.12 45 bottom
LB203  LB  [SL0402]  78.46 66.26 180 bottom
LB500  LB  [SL0402-TC]  74.9 62.91 270 bottom
LB501  LB  [SL0402-TC]  76.66 65.73 0 bottom
LB7200  LB  [SL0805]  112.97 94.27 270 top
LB7201  LB  [SL0402]  123.6 83.74 270 top
LB7202  LB  [SL0402]  123.6 81.84 270 top
LB7203  LB  [SL0805]  113.05 89.95 90 top
LB7204  LB  [SL0805]  125.17 100.62 180 top
M5401  HOLE-8STARS  [MTH_C6MMD3P2MM]  161.72 8.38 0 top
M5402  HOLE-8STARS  [MTH_C6MMD3P2MM]  161.72 130.48 0 top
M5404  HOLE-8STARS  [MTH_C6MMD3P2MM]  3.38 130.51 0 top
M5405  HOLE-8STARS  [MTH_C6MMD3P2MM]  3.38 8.38 0 top
M5410  HOLE  [HOLE100]  12.22 136.32 0 top
M5411  HOLE  [HOLE100]  12.34 2.46 0 top
M5412  HOLE  [HOLE100]  158.01 135.94 0 top
M5413  HOLE  [HOLE100]  156.87 2.72 0 top
M5414  M25-SMT  [SMT-M25]  114.33 52.5 0 top
M5415  M25-SMT  [SMT-M25]  147.98 8.81 0 top
M5416  M25-SMT  [SMT-M25]  114.33 8.81 0 top
M5417  M25-SMT  [SMT-M25]  147.98 52.5 0 top
M5418  M25-SMT  [SMT-M25]  47.14 71.17 0 top
M5419  M25-SMT  [SMT-M25]  3.58 114.99 0 top
M5420  M25-SMT  [SMT-M25]  3.58 71.3 0 top
M5421  M25-SMT  [SMT-M25]  47.14 114.99 0 top
NOREF  -  [unnamed]  8.92 15.16 90 top
NOREF#2  -  [#2]  82.58 0 90 top
NOREF#3  -  [#2]  102.64 48.82 0 top
NOREF#4  -  [#2]  82.58 5 90 top
NOREF#5  -  [#2]  5.36 49.45 0 top
NOREF#6  -  [unnamed]  154.71 10.46 90 top
NOREF#7  -  [#2]  5.99 17.2 0 top
NOREF#8  -  [unnamed]  155.04 129.97 90 top
NOREF#9  -  [#2]  -293.98 -61.8 0 top
NOREF#10  -  [#2]  0.03 69.46 0 top
NOREF#11  -  [#2]  87.53 136.58 0 top
NOREF#12  -  [unnamed]  8.92 15.16 90 bottom
NOREF#13  -  [unnamed]  154.71 10.46 90 bottom
NOREF#14  -  [unnamed]  155.04 129.97 90 bottom
Q17  SS8050  [SOT23]  33.3 110.67 270 top
Q18  SS8050  [SOT23]  37.87 110.79 270 top
Q22  CMD4932  [TO-252-3]  116.23 109.11 0 top
Q23  CMD4932  [TO-252-3]  138.11 106.73 90 top
Q33  CMD4932  [TO-252-3]  125.25 120.19 0 top
Q38  NPN-25V-1.5A-300mW-SOT23  [SOT23]  97.18 100.25 90 top
Q39  NPN-25V-1.5A-300mW-SOT23  [SOT23]  90.2 100.25 90 top
Q1101  SS8050  [SOT23]  115.85 122.86 90 bottom
Q1201  SI2302S  [SOT23]  26.11 98.58 0 bottom
Q1202  SI2302S  [SOT23]  22.5 98.58 0 bottom
Q1204  SS8050  [SOT23]  106.96 104.7 90 bottom
Q7800  PMOS-GSD  [SOT23]  54.61 19.74 180 top
Q7801  SS8050  [SOT23]  145.82 110.79 0 bottom
Q7802  SS8050  [SOT23]  69.49 47.68 0 top
R1  240  [SR0402]  84.18 64.01 90 bottom
R2  100R  [SR0402]  132.49 74.73 0 top
R32  49.9R  [SR0402]  34.32 39.29 270 top
R33  49.9R  [SR0402]  27.08 49.07 180 top
R36  402R-1%  [SR0402]  32.03 41.33 90 top
R37  NC  [SR0402]  29.36 50.09 0 top
R38  10K  [SR0402]  27.08 50.09 180 top
R40  10K  [SR0402]  29.36 46.79 180 top
R42  0R  [SR0402]  37.29 39.19 90 bottom
R57  2K  [SR0402]  20.85 62.03 180 top
R58  2K  [SR0402]  16.54 61.14 180 top
R74  2K2  [SR0402]  65.43 26.95 180 top
R75  0R  [SR0402]  68.99 19.23 90 top
R76  NC  [SR0402]  71.15 19.23 90 top
R77  NC  [SR0402]  70.13 19.23 90 top
R78  NC  [SR0402]  73.96 22.15 270 top
R79  NC  [SR0402]  67.34 22.15 270 top
R84  33R  [SR0402]  69.49 33.3 270 top
R85  0R  [SR0402]  68.48 33.3 270 top
R86  0R  [SR0402]  65.43 30.02 0 top
R87  0R  [SR0402]  75.34 28.5 180 top
R88  4.7K  [SR0402]  67.46 33.32 270 top
R89  4.7K  [SR0402]  65.43 31.04 0 top
R90  100K  [SR0402]  75.34 27.48 180 top
R98  1K  [SR0402]  33.68 113.46 180 top
R99  1K  [SR0402]  31.39 107.11 180 top
R100  1K  [SR0402]  38.38 113.46 180 top
R101  1K  [SR0402]  31.39 106.1 180 top
R186  1K  [SR0402]  29.36 52.37 0 top
R187  4.7K  [SR0402]  29.36 45.64 0 top
R188  4.7K  [SR0402]  29.36 44.5 0 top
R200  0/NC**  [SR1206-TD]  96.24 91.87 270 bottom
R201  0  [SR1206-TD]  95.35 82.91 90 bottom
R284  15K-1%  [SR0402]  11.84 33.96 270 top
R285  10K  [SR0402]  17.3 24.82 180 top
R300  240  [SR0402]  74.4 82.49 270 bottom
R301  240  [SR0402]  74.98 80.22 270 bottom
R302  0  [SR0402]  84.58 65.64 0 bottom
R303  0  [SR0402]  86.9 67.31 0 top
R304  0  [SR0402]  86.87 69.57 0 top
R305  0  [SR0402]  86.9 68.45 0 top
R308  1K  [SR0402]  83.74 85.01 180 bottom
R401  NC  [SR0402]  139.22 27.99 0 top
R402  10K  [SR0402]  139.22 29.13 0 top
R403  51.1K  [SR0402]  139.22 26.97 0 top
R404  40.2K  [SR0402]  139.22 25.96 0 top
R405  NC  [SR0402]  139.22 40.82 0 top
R406  10K  [SR0402]  139.22 39.67 0 top
R469  0R  [SR0402]  29.36 43.23 0 top
R476  2K  [SR0402]  13.23 60.25 180 top
R477  2K  [SR0402]  20.85 50.19 180 top
R478  2K  [SR0402]  16.54 49.3 180 top
R479  2K  [SR0402]  13.23 48.42 180 top
R502  4.7K/NC*  [SR0402-TA]  71.22 71.25 180 bottom
R505  560  [SR0402]  73 53.87 270 top
R506  1MEG/NC*  [SR0402]  72.59 55.4 0 top
R507  0  [SR0402]  71.06 80.09 270 top
R508  10k  [SR0402]  58.45 59.69 180 top
R509  18k  [SR0402]  59.89 60.05 90 top
R510  47  [SR0402]  70.5 77.62 0 bottom
R511  47  [SR0402]  69.88 79.55 270 top
R512  47  [SR0402]  68.28 76.91 270 top
R514  47  [SR0402]  69.48 79.3 270 bottom
R515  47  [SR0402]  68.82 81.04 270 bottom
R602  33  [SR0402]  85.15 60.96 0 bottom
R603  47  [SR0402-TA]  87.99 59.71 0 top
R604  33  [SR0402]  90.02 59.05 0 top
R605  33  [SR0402]  91.9 59.78 0 top
R606  33  [SR0402]  90.02 60.65 0 top
R607  33  [SR0402]  91.87 60.92 0 top
R608  33  [SR0402]  88.24 61.41 0 top
R609  33  [SR0402]  90.02 62.03 0 top
R700  33  [SR0402]  80.2 52.7 270 top
R701  33  [SR0402]  78.56 52.83 270 top
R702  33  [SR0402]  80.62 50.5 270 top
R703  33  [SR0402]  79.54 50.5 270 top
R704  33  [SR0402]  78.46 50.44 270 top
R705  33  [SR0402]  81.79 50.5 270 top
R706  33  [SR0402]  77.5 52.25 270 top
R707  33  [SR0402]  76.84 50.44 270 top
R708  33  [SR0402]  76.9 48.65 180 top
R709  33  [SR0402]  75.21 48.64 0 top
R710  33  [SR0402]  75.01 50.75 270 top
R711  33  [SR0402]  75.92 51.33 270 top
R961  33R  [SR0402]  132.46 39.85 0 top
R963  1K  [SR0402]  136.04 42.8 90 top
R967  NC/1K  [SR0402]  136.45 44.25 180 top
R1118  10K  [SR0402]  12.85 33.96 270 top
R1193  1K  [SR0402]  100.36 97.71 270 top
R1194  1K  [SR0402]  94.01 99.62 270 top
R1195  4.7K  [SR0402]  92.99 99.62 90 top
R1199  10K  [SR0402]  88.16 97.97 0 top
R1201  1M  [SR0402]  20.22 111.3 180 top
R1202  1K  [SR0402]  26.44 102.16 180 bottom
R1203  1K  [SR0402]  22.89 102.16 180 bottom
R1204  1K  [SR0402]  26.82 95.94 0 bottom
R1205  1K  [SR0402]  24.92 95.94 180 bottom
R1206  100K  [SR0402]  14.83 119.94 270 top
R1216  100K  [SR0402]  30.51 55.42 90 top
R1287  3.3K/1%  [SR0402]  145.95 113.46 0 bottom
R1288  1K/1%  [SR0402]  145.95 115.49 180 bottom
R1289  10k/1%  [SR0805]  143.66 107.49 270 top
R1290  1k-1%  [SR0402]  142.52 109.4 0 bottom
R1301  10K/NC  [SR0402]  105.82 114.73 90 top
R1304  10K  [SR0402]  104.67 114.73 90 top
R1307  10K  [SR0402]  99.34 121.34 0 top
R1309  20K  [SR0402]  108.61 118.8 0 top
R1310  0.1R 1%  [SR0603]  103.02 124.64 90 top
R1311  0.1R 1%  [SR0603]  104.8 124.64 90 top
R1313  22K/1%  [SR0402]  110.77 36.37 90 top
R1314  3K/1%  [SR0402]  111.79 36.37 90 top
R1315  10K/1%  [SR0402]  111.79 26.34 0 top
R1316  51k/1%  [SR0402]  108.74 36.37 90 top
R1317  10K/1%  [SR0402]  107.59 36.37 90 top
R1318  10K  [SR0402]  101.24 112.32 90 top
R1320  10K  [SR0402]  102.39 112.32 90 top
R1322  10K  [SR0402]  103.53 112.32 90 top
R1323  16K/1%  [SR0402]  98.2 36.37 90 top
R1331  NC/10K  [SR0402]  101.24 114.73 270 top
R1332  NC/10K  [SR0402]  102.39 114.73 270 top
R1333  NC/10K  [SR0402]  103.53 114.73 270 top
R1348  10K  [SR0402]  106.96 114.73 270 top
R1350  100  [SR0402]  110.64 106.22 180 bottom
R1351  2K  [SR0402]  115.98 110.67 180 bottom
R1352  10K  [SR0402]  104.04 105.33 90 bottom
R1353  2K  [SR0402]  103.02 105.33 90 bottom
R1381  100K/NC  [SR0402]  57.56 98.35 0 top
R1382  14.3K/1%  [SR0402]  64.03 95.78 0 top
R1383  27K/1%  [SR0402]  64.03 96.8 180 top
R1386  10K/1%  [SR0402]  64.03 98.86 0 top
R1387  10K/NC  [SR0402]  57.56 96.19 0 top
R1388  10K  [SR0402]  57.56 95.17 0 top
R1409  10K/1%  [SR0402]  52.22 40.82 0 bottom
R1410  20k/1%  [SR0402]  54 48.95 90 top
R1411  100k/1%  [SR0402]  52.86 48.95 90 top
R1412  10K/1%  [SR0603]  49.68 49.38 90 top
R1417  60R  [SR0402]  77.67 114.48 270 top
R1418  60R  [SR0402]  81.1 114.48 90 top
R1419  0R  [SR0402]  78.82 114.48 90 top
R1420  100R  [SR0402]  14.25 124.89 90 top
R1421  100R  [SR0402]  11.76 124.89 90 top
R1609  4.7K/NC  [SR0402]  131.85 26.34 90 top
R1612  4.7K  [SR0402]  139.22 35.99 0 top
R1624  1K  [SR0402]  13 77.47 270 top
R1790  10K/NC  [SR0402]  58.31 82.64 0 top
R1791  10K  [SR0402]  58.31 83.65 0 top
R1821  10K/1%  [SR0402]  97.18 26.34 0 top
R1822  16K/1%  [SR0402]  97.18 36.37 90 top
R1823  36K/1%  [SR0402]  96.16 36.37 90 top
R1824  10K/1%  [SR0402]  92.99 36.37 90 top
R1825  51k/1%  [SR0402]  94.01 36.37 90 top
R1832  10K/1%  [SR0402]  84.89 21.41 0 top
R1833  20k/1%  [SR0402]  79.43 23.11 0 top
R1834  10K/1%  [SR0402]  79.43 22.1 180 top
R1835  10K  [SR0402]  84.89 24.46 180 top
R1836  10K/NC  [SR0402]  84.89 23.44 180 top
R1868  10K/1%  [SR0402]  65.13 107.47 0 top
R1869  10K/1%  [SR0603]  132.36 112.19 180 top
R1884  4.7K  [SR0402]  76.53 114.48 270 top
R1888  4.7K  [SR0402]  15.52 88.06 270 top
R1932  4.7K  [SR0402]  139.22 37.13 180 top
R1941  10K  [SR0402]  127.41 40.06 270 top
R1942  0  [SR0402]  128.42 40.06 270 top
R1943  10K  [SR0402]  129.44 40.06 270 top
R1944  10K  [SR0402]  130.45 40.06 270 top
R1957  0R  [SR0402]  54.25 110.03 180 top
R1958  0R  [SR0402]  65.18 117.37 0 top
R1959  0R  [SR0402]  65.15 114.81 0 top
R1960  0R  [SR0402]  60.58 108 180 top
R1965  10k/1%  [SR0805]  123.34 118.54 180 bottom
R1966  3.3K/1%  [SR0402]  111.79 122.73 90 bottom
R1967  1K/1%  [SR0402]  110.64 122.73 270 bottom
R1968  1k-1%  [SR0402]  118.77 122.35 90 bottom
R3302  1K  [SR0402]  97.21 67.56 0 top
R3303  90.9k  [SR0603-TB]  99.7 68.12 0 top
R3304  1.3k  [SR0603-TB]  99.7 69.52 180 top
R3602  1K  [SR0402]  56.03 84.76 90 top
R3603  56.2k  [SR0603-TB]  58.51 84.87 180 top
R3604  6.8k  [SR0402-TA]  58.31 81.62 0 top
R3617  1K-1%  [SR0402]  56.54 90.73 90 top
R3618  56.2k-1%  [SR0603-TB]  57.68 93.14 90 top
R3619  6.8k-1%  [SR0402-TA]  61.49 96.04 0 bottom
R4200  1K  [SR0402]  81.18 18.08 270 top
R4201  10k  [SR0402]  86.64 18.08 270 top
R4202  4.7K  [SR0402]  79.91 18.08 270 top
R4203  4.7K/NC*  [SR0402]  85.37 18.08 270 top
R4204  4.7K  [SR0402]  83.97 18.08 270 top
R4205  4.7K  [SR0402]  82.58 18.08 270 top
R4208  0/NC*  [SR0402]  58.75 23.16 270 top
R4209  100K  [SR0402]  61.93 23.16 270 top
R4210  0  [SR0402]  60.78 23.16 270 top
R4211  0  [SR0402]  58.57 13.46 90 top
R4214  10k  [SR0402]  59.13 33.1 180 top
R4216  10k  [SR0402]  57.43 13.46 270 top
R4500  10K/NC*  [SR0402]  79.4 42.38 270 bottom
R4501  47K/NC*  [SR0402]  87.46 43.37 180 bottom
R4502  47K/NC*  [SR0402]  78.19 44.81 0 bottom
R4506  47K/NC*  [SR0402]  83.9 45.71 270 bottom
R4507  47K/NC*  [SR0402]  87.46 41.34 180 bottom
R4510  47K/NC*  [SR0402]  87.46 42.36 180 bottom
R4511  20K  [SR0402]  81.23 42.6 0 bottom
R4531  4.7K  [SR0402]  84.48 94.16 180 top
R4532  4.7K  [SR0402]  84.48 97.97 0 top
R4533  4.7K  [SR0402]  70 95.94 90 bottom
R5400  1k/NC*  [SR0402]  38.89 87.01 0 bottom
R5401  1k/NC*  [SR0402]  38.89 88.03 180 bottom
R6600  1k  [SR0402]  125.33 63.4 0 top
R6601  1k  [SR0402]  125.33 64.67 0 top
R6602  4.7K  [SR0402]  112.76 64.67 0 top
R6603  4.7K  [SR0402]  112.76 63.4 0 top
R6604  1k  [SR0402]  36.78 59.61 180 top
R6605  1k  [SR0402]  36.75 58.34 180 top
R6606  4.7K  [SR0402]  46.96 58.32 0 bottom
R6607  4.7K  [SR0402]  46.96 59.59 0 bottom
R6608  4.7K  [SR0402]  112.75 62.36 0 top
R6609  1k  [SR0402]  125.33 62.13 0 top
R6610  1k  [SR0402]  101.27 58.75 0 top
R6611  1k/NC  [SR0402]  101.27 59.97 0 top
R6612  4.7K  [SR0402]  98.76 59.92 0 top
R6613  4.7K/NC  [SR0402]  98.76 58.88 0 top
R6614  4.7K/NC  [SR0402]  98.76 57.61 0 top
R6615  1k  [SR0402]  101.24 57.51 0 top
R6616  4.7K/NC  [SR0402]  38.38 85.78 0 top
R6617  1k  [SR0402]  39.01 87.05 180 top
R6618  100  [SR0402]  11.53 64.74 90 top
R6619  4.7K  [SR0402]  11.94 63.27 180 top
R7200  4.7K  [SR0402]  115.6 100.56 180 bottom
R7201  4.7K  [SR0402]  115.57 99.5 0 top
R7202  4.7K/NC*  [SR0402]  115.6 101.71 0 bottom
R7203  1.5K  [SR0402]  121.69 98.84 90 top
R7204  4.7K  [SR0402]  122.91 101.2 90 top
R7205  75  [SR0805]  148.68 100.53 90 bottom
R7206  510  [SR0402]  126.77 83.74 270 top
R7207  510  [SR0402]  126.64 81.84 270 top
R7208  22  [SR0402]  113.05 100.56 0 top
R7209  22  [SR0402]  115.6 100.56 0 top
R7210  22  [SR0402]  113 101.73 0 top
R7211  22  [SR0402]  115.57 96.38 0 top
R7212  4.7K  [SR0402]  120.42 89.59 270 top
R7213  4.7K  [SR0402]  119.45 89.59 270 top
R7214  22  [SR0402]  113.05 99.55 0 top
R7215  22  [SR0402]  113.05 98.53 0 top
R7216  2.49K  [SR0603]  123.13 92.27 90 bottom
R7217  4.7K/NC*  [SR0402]  118.89 86.78 270 top
R7218  4.7K  [SR0402]  119.91 86.78 270 top
R7219  0  [SR0402]  121.81 90 180 top
R7220  0  [SR0402]  125.37 90.97 180 top
R7221  0/NC*  [SR0402]  123.97 90.43 90 top
R7222  0/NC*  [SR0402]  121.43 88.55 90 top
R7223  4.7K  [SR0402]  115.6 101.71 180 top
R7224  4.7K  [SR0402]  115.59 95.36 180 top
R7225  4.7K  [SR0402]  115.57 97.31 180 top
R7226  4.7K  [SR0402]  115.57 98.43 0 top
R7800  2K  [SR0402]  54.44 22.72 0 top
R7801  47K/NC*  [SR0402]  49.33 24.1 270 bottom
R7802  47K/NC*  [SR0402]  55.65 23.98 270 bottom
R7803  47K/NC*  [SR0402]  54.48 23.98 270 bottom
R7804  47K/NC*  [SR0402]  48.29 24.1 270 bottom
R7805  47K/NC*  [SR0402]  47.24 24.1 270 bottom
R7806  10k  [SR0402]  50.47 19.33 180 top
R7807  10k  [SR0402]  56.67 23.98 270 bottom
R7808  100  [SR0402]  55.22 24.71 0 top
R8100  5.1  [SR0402]  20.78 25.06 270 top
R8101  0  [SR0402]  19.74 27.09 270 top
R8102  5.1  [SR0402]  19.72 25.06 270 top
R8107  0  [SR0402]  20.76 27.09 270 top
R8111  100R  [SR0402]  132.49 75.87 0 top
R8112  NC  [SR0402]  93.73 40.51 90 top
R8113  NC  [SR0402]  95 40.51 90 top
R8114  NC  [SR0402]  91.19 40.51 90 top
R8115  NC  [SR0402]  92.46 40.51 90 top
R8116  33  [SR0402]  89.92 40.51 90 top
R8117  33  [SR0402]  93.73 42.8 90 top
R8118  33  [SR0402]  95 42.8 90 top
R8119  33  [SR0402]  91.19 42.8 90 top
R8120  33  [SR0402]  92.46 42.8 90 top
R8121  33/NC  [SR0402]  89.92 42.8 90 top
R8132  1k  [SR0402]  53.37 11.23 90 top
R8133  1k  [SR0402]  54.51 11.23 90 top
R8134  1k  [SR0402]  55.65 11.23 90 top
R8142  0  [SR0402]  135.79 26.34 90 top
R8144  1K  [SR0402]  115.32 31.6 90 top
R8145  1K  [SR0402]  116 40.61 90 top
R8146  0  [SR0402]  119.89 31.6 90 top
R8147  0  [SR0402]  119.3 40.61 90 top
R8148  4.7K  [SR0402]  118.75 31.6 90 top
R8149  0R  [SR0402]  33.43 60.25 180 top
R8150  0R  [SR0402]  33.43 59.23 180 top
R8151  0R  [SR0402]  30.39 63.02 270 top
R8152  910-1%  [SR0402]  78.23 45.86 180 bottom
R8153  0  [SR0402]  136.8 26.34 270 top
R8154  0  [SR0402]  127.91 55.42 270 bottom
R8156  0  [SR0402]  127.91 55.42 270 top
R8158  0  [SR0402]  61.11 72.95 180 top
R8159  0  [SR0402]  130.84 26.34 90 top
R8161  4.7K/NC  [SR0402]  102.67 69.04 0 top
R8162  11.3k/1%  [SR0402]  97.21 70.74 0 top
R8163  18k/1%  [SR0402]  97.21 69.72 180 top
R8164  10K  [SR0402]  102.67 72.09 180 top
R8165  10K/NC  [SR0402]  102.67 71.07 180 top
R8166  10K/1%  [SR0402]  103.84 84.73 270 top
R8167  15K/1%  [SR0402]  103.84 81.69 90 top
R8168  18k/1%  [SR0402]  101.8 81.69 270 top
